# Altium PCB Relay-10A-Switching-Board-v2.0.PcbDoc (part 3 of 3)
Units mil, origin at the board's own origin, x right, y up, seen from the top; angles counter-clockwise.
Board outline 8267.72 x 4330.71 mil, 2 copper layers (Top Layer, Bottom Layer), stack 62.205 mil thick; 145 components, 106 nets, 426 pads, 105 vias.
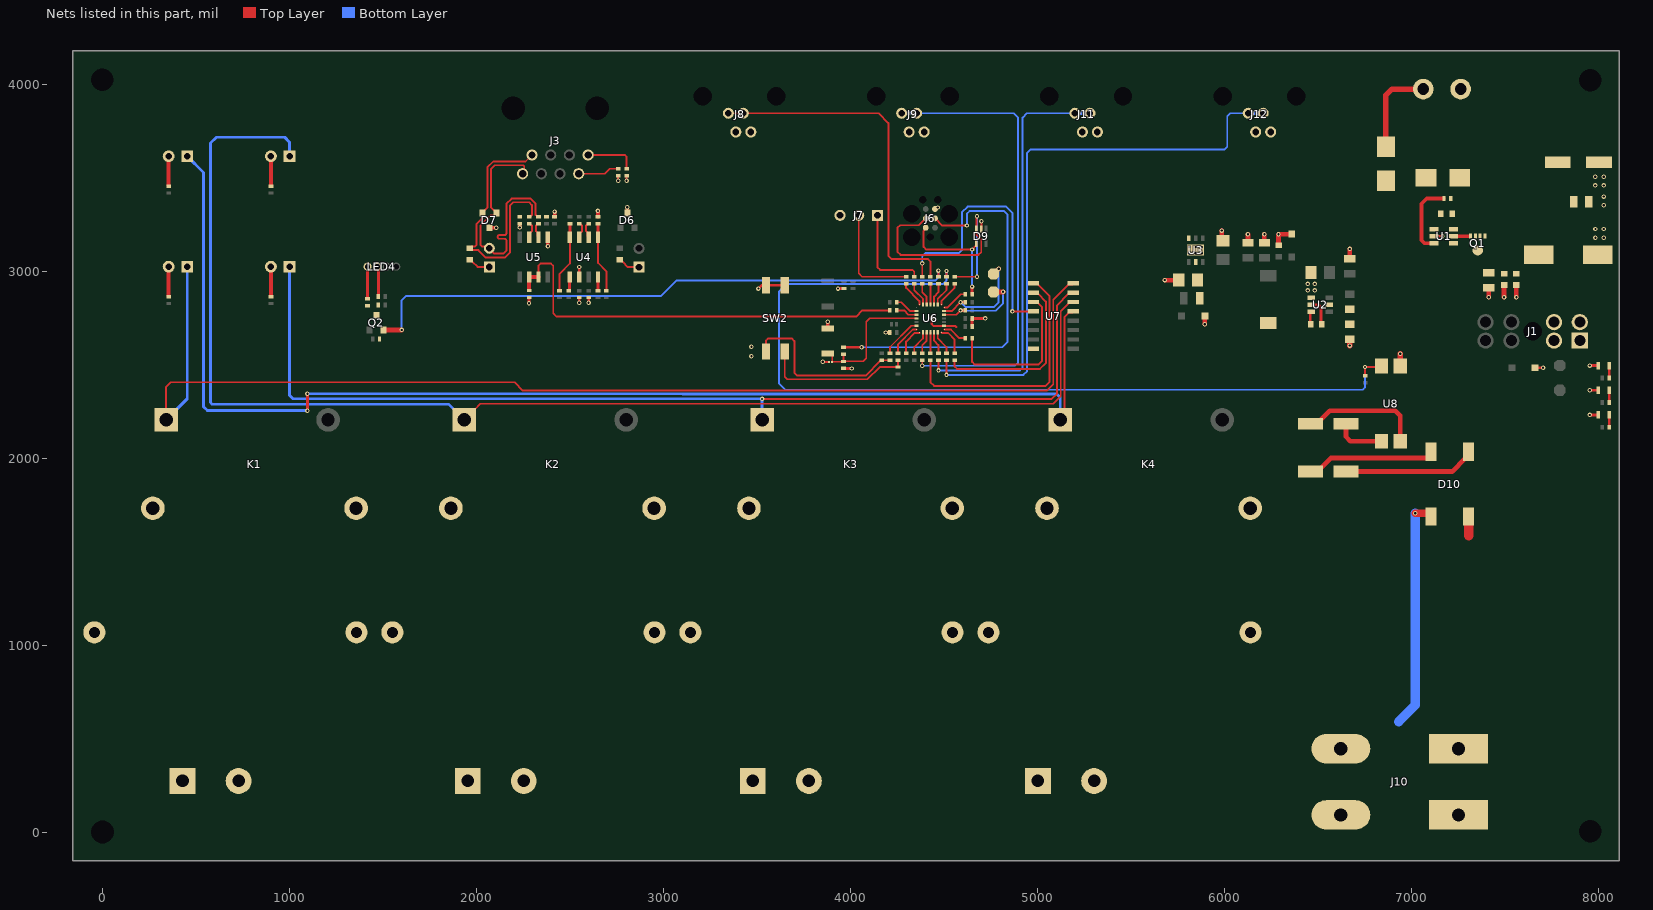
[diagram p2: the nets of this part, all layers, seen from the top]

## Via types
v1: diameter 23.62, hole 11.81, Top Layer to Bottom Layer, tented both sides, 105 vias

## Nets (pads, with @x,y where several pads share a name; then routed paths per layer and width w, separated by ;. In a path a pad name is that pad's centre, name@x,y a point inside that pad or via, vN(x,y) a via of type N, cw(c..) or ccw(c..) an arc to the next point about the centre after c; other vN are vias at no path point) (continued)
DI_PA15: R44.1 R52.1 U8.4 | length 4891.3
  Top Layer w10: R44.1@4513.5,2969.63 v1(4513.5,3000.28) ; R52.1@6750.33,2440.08 6750.81,2440.56 6750.81,2486.29 v1(6751.29,2486.77) 6834.89,2486.77 U8.4@6839.76,2491.64
  Bottom Layer w10: v1(4513.5,3000.28) 4513.5,2950.49 4493.12,2930.1 3658.4,2930.1 3617.53,2889.24 3617.53,2398.84 3650.95,2365.42 6738.7,2365.42 6751.29,2378.01 v1(6751.29,2486.77)
DO_PA5: R33.1 U7.1 | length 1345
  Top Layer w10: R33.1@4427.14,2523.13 4427.14,2405.79 4447.12,2385.81 5042.93,2385.81 5064.51,2407.39 5064.51,2866.29 5003.14,2927.66 5003.14,2927.82 4996.72,2934.24 U7.1@4978.61,2934.24
DO_PB0: R23.1 U7.2 | length 954.7
  Top Layer w10: R23.1@4556.67,2523.13 4556.67,2489.3 4569.97,2476 5012.68,2476 5044.51,2507.83 5044.51,2836.45 5003.14,2877.82 4996.72,2884.24 U7.2@4978.61,2884.24
DO_PB1: R25.1 U7.3 | length 857.7
  Top Layer w10: R25.1@4650.39,2640.03 4650.39,2514.44 4664.83,2500 5003.68,2500 5024.51,2520.82 5024.51,2807.13 5003.82,2827.82 4985.03,2827.82 U7.3@4978.61,2834.24
DO_PB5: R32.1 U7.4 | length 1472.7
  Top Layer w10: R32.1@4383.97,2969.63 v1(4383.97,3040.65) ; v1(4866.04,2784.24) U7.4@4978.61,2784.24
  Bottom Layer w10: v1(4383.97,3040.65) 4383.97,3077.98 4403.18,3097.2 4581.39,3097.2 4595.97,3111.78 4595.97,3314.17 4626.14,3344.33 4833.07,3344.33 4866.04,3311.36 v1(4866.04,2784.24)
DO_PF1: R21.1 R46.1 U5.2 U5.3 | length 2347.2
  Top Layer w10: R21.1@2281.53,2895.7 2281.86,2896.04 R21.1@2281.86,2901.07 ; U5.3@2331.5,2968 2331.5,3028.4 2343.31,3040.21 2397.74,3040.21 2410.77,3027.18 2410.77,2773.47 2427.91,2756.33 4030.02,2756.33 4063.25,2789.56 R46.1@4210.89,2789.56
  Top Layer w20: R21.1@2281.86,2901.07 2281.51,2901.42 2281.51,2967.99 U5.3@2331.5,2968
GND: C1.2 C2.2 C3.1 C4.1 C5.1 C6.1 C9.1 C10.1 C11.1 C12.1 C13.1 C14.1 C15.1 C16.1 C17.1 C18.1 C19.1 C20.1 C21.2 C22.2 C23.2 D2.1 D3.2 D4.1 D5.1 D6.3 D7.3 D8.1 D9.2 J2.1 J6.5 J7.3 J8.2 J8.4 J9.2 J9.4 J11.2 J11.4 J12.2 J12.4 LED1.2 LED2.2 LED3.2 LED4.3 R4.1 R11.1 R12.1 R17.1 R21.2 R48.1 R60.2 SW1.2 SW2.3 SW2.4 U1.2 U2.4 U3.6 U3.7 U4.2 U5.5 U6.16 U7.8 U8.3 | length 2619.1
  Top Layer w10: v1@3852.32,2514.45 D8.1@3880.42,2514.45 ; D9.2@4699.06,3224.95 4699.69,3225.57 4699.69,3265.44 v1(4700.23,3265.99)
  Top Layer w11: v1(2757.88,3483) R11.1@2757.88,3509.56 ; v1(2802.88,3483) R12.1@2802.88,3509.55 ; v1(4434.42,2746.88) 4434.42,2715.54 4442.95,2707.01 U6.16@4500.96,2707.01 4558.74,2707.01 4565.49,2700.26
  Top Layer w15: C18.1@1475.5,2863.91 LED4.3@1475.5,3023.36 ; v1(2280.93,2828) 2281.23,2828.3 2281.23,2858.4 R21.2@2281.53,2858.7 ; v1(2549.22,2830) 2549.51,2830.29 2549.51,2857.92 C17.1@2549.79,2858.21 ; U4.2@2549.8,2968 v1(2549.79,3021.42) ; v1(2599.47,2830) 2599.89,2830.41 2599.89,2857.8 C16.1@2600.3,2858.21 ; v1(3507.81,2905.77) 3524.59,2922.55 3547.31,2922.55 SW2.4@3548.3,2923.55 SW2.3@3648.3,2923.55 ; v1(3852.24,2514.37) v1@3852.32,2514.45 ; v1(3933.28,2905.77) 3933.63,2906.12 3965.39,2906.12 R48.1@3965.75,2906.47 ; C20.1@3962.61,2479.46 3963.05,2479.02 4005.98,2479.02 v1(4006.42,2478.57) ; v1(4188.33,2671.2) C23.2@4210.88,2671.2 ; C22.2@4650.39,2703.2 C21.2@4650.39,2746.38 ; C21.2@4650.52,2746.51 v1@4720.3,2746.51 ; R4.1@6669.87,2636.37 R4.1@6670.01,2636.37 ; U1.2@7120.48,3186.12 v1@7165.73,3186.12 ; D2.1@7660.43,2483.06 v1(7703.34,2483.06) ; v1(7952.76,2230.57) LED3.2@7998.64,2230.61 ; v1(7952.76,2362.34) LED2.2@7998.24,2362.34 ; v1(7952.76,2494.02) LED1.2@7998.62,2494.04
  Top Layer w20: D7.3@2068.5,3229.32 2070.14,3230.96 v1(2105.9,3230.96) ; v1(2231.5,3232.92) R60.2@2231.5,3250.01 ; v1@2381.5,3132.67 U5.5@2381.5,3180.6 ; C19.1@2418.3,3291.25 2418.3,3316.9 v1@2419.08,3316.9 ; R17.1@2649.8,3291.85 v1@2649.8,3320.97 ; D6.3@2806.73,3311.34 v1@2806.73,3340.46 ; SW1.2@3878.95,2691.95 v1(3878.95,2728.57)
  Top Layer w25: v1(5680.07,2951.46) C15.1@5755.66,2951.46 ; D5.1@5894.1,2759.08 5894.75,2758.42 v1(5894.75,2715) ; C14.1@5985,3162.21 v1(5985,3216.35) ; C12.1@6125.25,3152.21 v1(6125.25,3196.39) ; C11.1@6213.25,3152.21 v1(6213.25,3196.39) ; C13.1@6288.89,3137.21 v1(6288.89,3196.39) 6357.58,3196.39 D4.1@6359.91,3198.72 ; C10.1@6670.01,3066.3 v1(6670.01,3118.39) ; v1(7413.19,2860) C4.1@7413.19,2910.14 ; v1(7494.88,2860) C5.1@7494.88,2925.14 ; v1(7560.88,2860) C6.1@7560.88,2925.13
  Top Layer w30: v1(6670.01,2601.39) R4.1@6670.01,2636.37 ; D3.2@6863.15,3663.83 6863.15,3940.59 6895.54,3972.98 J2.1@7062.82,3972.98 ; U8.3@6939.76,2491.64 v1(6939.76,2557.16)
  other v1: 3470,2544.75 3470,2595 4720.42,2746.63 6445.6,2896.07 6482.6,2896.07 6445.6,2931.07 6482.6,2931.07 5812.93,3095.47 5845.93,3095.47 5878.93,3095.47 5812.93,3128.47 5845.93,3128.47 5878.93,3128.47 2381.77,3132.4 7983.15,3177.9 8028.15,3177.9 7165.89,3185.96 7983.15,3224.54 8028.15,3224.54 2417.98,3318 2649.53,3321.24 4466.91,3339.62 2806.46,3340.73 8028.15,3351.18 8028.15,3397.82 7982.75,3457.54 8027.75,3457.54 7982.75,3504.19 8027.75,3504.19
ID0: R22.1 R38.1 SW2.1 | length 938.2
  Top Layer w10: SW2.1@3548.3,2569.22 3548.3,2628.3 3560,2640 3685,2640 3700,2625 3700,2456.78 3715.83,2440.96 4081.61,2440.96 4159.78,2519.13 4160.19,2519.13 4163.78,2522.72 R38.1@4163.78,2523.13 ; R38.1@4167.69,2523.13 R22.1@4211.25,2523.13
ID1: R24.1 R37.1 SW2.2 | length 810.3
  Top Layer w10: SW2.2@3648.3,2569.22 3648.3,2434.56 3661.9,2420.96 4090.77,2420.96 4156.22,2486.41 R37.1@4254.43,2486.41 R24.1@4254.43,2523.13
LED: Q2.2 R27.1 R49.1 | length 3247
  Top Layer w10: Q2.2@1501.68,2685.23 Q2.2@1502.07,2684.84 ; R27.1@4470.33,2969.63 v1(4470.33,3002)
  Top Layer w25: Q2.2@1502.07,2684.84 v1(1600,2684.84)
  Bottom Layer w10: v1(1600,2684.84) 1600,2843.78 1621.73,2865.51 2985.94,2865.51 3070.53,2950.1 4454.78,2950.1 4470.33,2965.64 v1(4470.33,3002)
LED1_DIN: LED4.4 R51.2 | length 171.4
  Top Layer w10: LED4.4@1417.48,3023.36 LED4.4@1417.6,3023.23 ; R51.2@1417.6,2852.24 R51.2@1417.73,2852.11
  Top Layer w15: R51.2@1417.6,2852.24 LED4.4@1417.6,3023.23
LIVE: D10.4 J10.1 J15.1 J16.1 J21.1 J22.1 | length 102.6
  Top Layer w50: 7305.22,1584.78 D10.4@7305.22,1687.37
NetC2_1: C2.1 C3.2 C7.2 D1.2 J2.2 Q1.1 Q1.2 Q1.3 R1.1 U1.6
NetC7_1: C7.1 U1.1
NetC8_1: C8.1 L1.1 U2.5 | length 150.6
  Top Layer w15: U2.5@6462.6,2818.77 U2.5@6464.81,2818.77 6503.69,2818.77 6515.92,2806.55 C8.1@6515.92,2714.36
NetC8_2: C8.2 U2.6 | length 68.6
  Top Layer w15: C8.2@6458.74,2714.36 6458.74,2777.51 U2.6@6462.6,2781.37
NetC15_2: C15.2 F1.1 U3.2
NetD1_1: D1.1 D3.1
NetD10_1: D10.1 R53.1 | length 711.5
  Top Layer w25: R53.1@6649.55,1927.75 7218.11,1927.75 7288.19,1997.83 7288.19,2017.59 D10.1@7305.22,2034.62
NetD10_2: D10.2 R54.1 | length 696.1
  Top Layer w25: R54.1@6460,1927.75 6495.43,1927.75 6567.69,2000 7082.41,2000 7104.43,2022.03 D10.2@7104.43,2034.62
NetJ3_7: J3.7 R11.2 | length 221.9
  Top Layer w10: J3.7@2546.85,3520.31 2685.79,3520.31 2712.03,3546.55 R11.2@2757.88,3546.56
NetJ3_8: J3.8 R12.2 | length 274.4
  Top Layer w10: J3.8@2596.84,3620.31 2793.65,3620.31 2802.88,3611.08 R12.2@2802.88,3546.55
NetJ4_1: J4.1 R15.1 | length 119.1
  Top Layer w10: R15.1@2766.68,3061.28 2778.18,3049.78 2781.13,3049.78 2810.11,3020.81 J4.1@2869.05,3020.81
NetJ5_1: J5.1 R20.1 | length 120.9
  Top Layer w10: R20.1@1964.47,3061.28 1966.97,3061.28 1978.47,3049.78 1978.47,3048.99 2005.67,3021.79 J5.1@2068.5,3021.79
NetJ6_3: J6.3 R30.1 | length 2049.3
  Top Layer w10: J6.3@4452.14,3281.48 4490.34,3243.29 v1(4622.81,3243.29)
  Top Layer w15: R30.1@3962.45,2592.73 3962.53,2592.65 4059.19,2592.65 v1(4059.27,2592.57)
  Bottom Layer w10: v1(4059.27,2592.57) 4810.57,2592.57 4840.06,2622.06 4840.06,3301.1 4821.16,3320 4636.33,3320 4622.81,3306.48 v1(4622.81,3243.29)
NetJ15_2: J15.2 K1.3
NetJ16_2: J16.2 K2.3
NetJ21_2: J21.2 K3.3
NetJ22_2: J22.2 K4.3
NetLED1_1: LED1.1 R2.2 | length 65.8
  Top Layer w15: R2.2@8057.61,2428.33 8057.65,2428.38 8057.65,2494.02 LED1.1@8057.69,2494.06
NetLED2_1: LED2.1 R5.2 | length 65.8
  Top Layer w15: R5.2@8057.61,2296.61 R5.2@8057.61,2296.61 LED2.1@8057.69,2362.34 LED2.1@8057.69,2362.34
NetLED3_1: LED3.1 R6.2 | length 65.8
  Top Layer w15: R6.2@8057.62,2164.89 R6.2@8057.62,2164.89 LED3.1@8057.69,2230.61 LED3.1@8057.69,2230.61
NetLED5_2: LED5.2 R55.2 | length 160.4
  Top Layer w10: R55.2@353.76,2863.36 354.19,2863.79 R55.2@354.19,2867.5
  Top Layer w20: LED5.2@353.73,3023.33 353.73,2867.96 R55.2@354.19,2867.5
NetLED6_2: LED6.2 R56.2 | length 160.2
  Top Layer w10: R56.2@901,3453.91 901.19,3454.1 R56.2@901.19,3456.47
  Top Layer w20: LED6.2@900.94,3613.91 900.97,3456.69 R56.2@901.19,3456.47
NetLED7_2: LED7.2 R57.2 | length 160.4
  Top Layer w10: R57.2@901.01,2863.36 901.52,2863.87 R57.2@901.52,2865.19
  Top Layer w20: LED7.2@900.94,3023.36 900.97,2865.73 R57.2@901.52,2865.19
NetLED8_2: LED8.2 R58.2 | length 160.6
  Top Layer w10: R58.2@353.76,3453.91 354.51,3454.66 R58.2@354.51,3458.99
  Top Layer w20: LED8.2@353.73,3613.88 353.73,3459.77 R58.2@354.51,3458.99
NetQ1_4: Q1.4 U1.5 | length 88.9
  Top Layer w20: U1.5@7223.63,3186.12 Q1.4@7312.55,3186.12
NetQ2_3: Q2.3 R50.1 R51.1
NetR1_2: R1.2 U1.3 | length 399.5
  Top Layer w20: U1.3@7120.48,3148.72 7069.38,3148.72 7053.15,3164.95 7053.15,3359.34 7081.32,3387.51 R1.2@7172.54,3387.51
NetR3_1: R3.1 R4.2 U2.2
NetR7_1: R7.1 R8.2 U4.8 | length 375.8
  Top Layer w10: R8.2@2444.5,2895.35 2444.5,2984.91 2499.8,3040.21 U4.8@2499.8,3180.6
  Top Layer w15: U4.8@2499.8,3180.6 R7.1@2499.8,3248.2
NetR9_2: R9.2 U4.1 | length 76.3
  Top Layer w15: R9.2@2493.79,2895.21 2495.48,2895.21 2496.98,2896.71 2496.98,2965.18 U4.1@2499.8,2968
NetR10_1: R10.1 U4.7 | length 100.8
  Top Layer w10: U4.7@2549.8,3180.6 2549.8,3183.1 U4.7@2549.8,3185.6 ; U4.7@2549.79,3199.29 U4.7@2549.79,3185.61 ; R10.1@2549.79,3253.21 2553.76,3253.22 2564.43,3242.55 2564.43,3213.48 2549.8,3198.85 U4.7@2549.8,3185.6
NetR13_2: R13.2 U4.4 | length 72.8
  Top Layer w15: R13.2@2649.79,2895.21 U4.4@2649.8,2968
NetR14_1: R14.1 U4.6 | length 86.1
  Top Layer w10: U4.6@2599.8,3180.6 2592.99,3187.41 2592.99,3206.43 2585.95,3213.47 2585.95,3242.63 2592.3,3248.98 2592.3,3249.21 2596.3,3253.21 R14.1@2599.79,3253.22
NetR16_2: R16.2 R17.2 U4.5 | length 371.6
  Top Layer w10: U4.5@2649.8,3180.6 2649.8,3043.42 2694.8,2998.42 R16.2@2694.79,2895.21
  Top Layer w15: U4.5@2649.8,3180.6 R17.2@2649.8,3248.2
NetR18_1: R18.1 U5.7 | length 100.8
  Top Layer w10: U5.7@2281.5,3180.6 2281.5,3183.1 U5.7@2281.5,3185.6 ; U5.7@2281.5,3199.29 U5.7@2281.5,3185.6 ; R18.1@2281.49,3253.22 2285.46,3253.22 2296.13,3242.55 2296.13,3213.48 2281.5,3198.85 U5.7@2281.5,3185.6
NetR19_1: R19.1 U5.6 | length 86.1
  Top Layer w10: U5.6@2331.5,3180.6 2324.69,3187.41 2324.69,3206.42 2317.65,3213.46 2317.65,3242.63 2324,3248.98 2324,3249.21 2328,3253.21 R19.1@2331.5,3253.21
NetR53_2: R53.2 U8.1 | length 270.1
  Top Layer w25: R53.2@6649.55,2183.65 6649.55,2113.43 6672.92,2090.06 U8.1@6839.76,2090.06
NetR54_2: R54.2 U8.2 | length 657.9
  Top Layer w25: R54.2@6460,2183.65 6495.43,2183.65 6514.43,2202.65 6514.43,2204.59 6563.4,2253.56 6913.3,2253.56 6939.76,2227.1 U8.2@6939.76,2090.06
NEUTRAL: D10.3 J10.2 J13.2 J14.2 J19.2 J20.2 | length 1248.2
  Top Layer w40: v1(7020,1705) 7094.91,1705 7104.43,1695.47 D10.3@7104.43,1687.37
  Bottom Layer w50: 6930.85,590.16 7020,679.32 v1(7020,1705)
NRST_MCU: C20.2 D8.2 R30.2 SW1.1 U6.4 | length 760.7
  Top Layer w8: SW1.1@3878.95,2558.1 3889.43,2558.1 3901.57,2545.95 3901.57,2514.45 3960.6,2514.45 ccw(c3960.6,2516.46) C20.2@3962.61,2516.46 4067.38,2516.46 4085.2,2534.28 4085.2,2728.84 4102.74,2746.38 U6.4@4353.33,2746.38 ; R30.2@3962.61,2555.4 R30.2@3962.94,2555.74
  Top Layer w10: C20.2@3962.61,2516.46 R30.2@3962.61,2555.4
PA0: R22.2 U6.6 | length 222.5
  Top Layer w10: R22.2@4211.25,2560.13 4211.26,2593.65 4324.62,2707.01 U6.6@4353.33,2707.01
PA1: R24.2 U6.7 | length 178.5
  Top Layer w10: R24.2@4254.43,2560.13 4254.43,2607.73 4334.03,2687.33 U6.7@4352.34,2687.33
PA2: R26.2 U6.8 | length 154.3
  Top Layer w10: R26.2@4297.61,2558.16 4297.61,2560.13 4297.61,2622.63 4344.41,2669.42 4368.09,2669.42
PA3: R28.2 U6.9 | length 131.9
  Top Layer w10: R28.2@4340.79,2558.16 4340.79,2592.94 4387.77,2639.93 U6.9@4387.77,2670.6
PA4: R31.2 U6.10 | length 122.2
  Top Layer w10: R31.2@4383.97,2558.16 4383.97,2603.89 4407.46,2627.39 U6.10@4407.46,2670.6
PA5: R33.2 U6.11 | length 112.4
  Top Layer w10: R33.2@4427.14,2558.16 U6.11@4427.14,2670.6
PA6: R35.2 U6.12 | length 122.2
  Top Layer w10: U6.12@4446.83,2670.6 4446.83,2627.39 4470.32,2603.89 R35.2@4470.32,2558.16
PA7: R39.2 U6.13 | length 131.9
  Top Layer w10: U6.13@4466.51,2670.6 4466.51,2639.93 4513.5,2592.94 R39.2@4513.5,2558.16
PA11: R40.2 TP3.1 U6.19 | length 479.3
  Top Layer w10: U6.19@4500.96,2766.07 4565.49,2766.07 v1(4588.98,2789.56)
  Top Layer w15: v1(4588.98,2789.56) R40.2@4613.4,2789.56 ; TP3.1@4765.42,2887.46 TP3.1@4766.08,2888.12 ; v1@4815.58,2888.12 v1(4816.25,2888.78)
  Top Layer w25: TP3.1@4766.08,2888.12 v1@4815.58,2888.12
  Bottom Layer w10: v1(4588.98,2789.56) 4590.84,2787.71 4776.35,2787.71 4816.25,2827.61 v1(4816.25,2888.78)
PA12: R41.2 TP4.1 U6.20 | length 567.1
  Top Layer w10: U6.20@4500.96,2785.75 4540.53,2785.75 4586.99,2832.21 4592.45,2832.21 v1@4592.98,2832.74
  Top Layer w15: v1@4592.98,2832.74 R41.2@4613.39,2832.73 ; TP4.1@4765.42,2984.57 TP4.1@4765.42,2984.83 ; TP4.1@4767.5,2997.26 TP4.1@4777.84,2997.26 ; v1@4792.44,3011.85 v1(4792.44,3012.11)
  Top Layer w25: TP4.1@4777.84,2997.26 v1@4792.44,3011.85
  Bottom Layer w10: v1(4588.98,2832.74) 4614.01,2807.71 4767.71,2807.71 4792.44,2832.44 v1(4792.44,3012.11)
PA13: R42.1 U6.21 | length 140.6
  Top Layer w10: U6.21@4501.95,2805.44 4520.26,2805.44 4590.74,2875.91 R42.1@4613.4,2875.91
PA14: R43.1 U6.22 | length 140.6
  Top Layer w10: U6.22@4486.2,2821.19 4486.2,2839.5 4556.68,2909.97 R43.1@4556.68,2932.64
PA15: R44.2 U6.23 | length 131.9
  Top Layer w10: U6.23@4466.51,2820.2 4466.51,2850.87 4513.5,2897.85 R44.2@4513.5,2932.63
PB0: R23.2 U6.14 | length 161.6
  Top Layer w10: U6.14@4486.2,2671.58 4489.18,2668.6 4521.65,2668.6 4556.68,2633.57 R23.2@4556.67,2560.13 R23.2@4556.68,2558.16
PB1: R25.2 U6.15 | length 130.4
  Top Layer w10: U6.15@4501.95,2687.33 4536.91,2687.33 4582.7,2641.54 R25.2@4613.39,2641.54
PB3: R27.2 U6.24 | length 122.2
  Top Layer w10: U6.24@4446.83,2820.2 4446.83,2863.41 4470.32,2886.9 R27.2@4470.33,2932.63
PB4: R29.2 U6.25 | length 112.4
  Top Layer w10: U6.25@4427.14,2820.2 R29.2@4427.15,2932.63
PB5: R32.2 U6.26 | length 122.2
  Top Layer w10: R32.2@4383.97,2932.63 4383.97,2886.9 4407.46,2863.41 U6.26@4407.46,2820.2
PB6: R34.2 U6.27 | length 131.9
  Top Layer w10: R34.2@4340.79,2932.63 4340.79,2897.85 4387.77,2850.87 U6.27@4387.77,2820.2
PB7: R36.2 U6.28 | length 140.6
  Top Layer w10: R36.2@4297.61,2932.63 4297.61,2909.97 4368.09,2839.5 U6.28@4368.09,2821.19
PF0: R45.2 U6.2 | length 124.9
  Top Layer w10: R45.2@4247.89,2832.74 4271.95,2832.74 4318.94,2785.75 U6.2@4353.33,2785.75
PF1: R46.2 U6.3 | length 115.2
  Top Layer w10: R46.2@4247.89,2789.56 4286.62,2789.56 4310.12,2766.07 U6.3@4353.33,2766.07
RELAY-1: K1.1 LED5.1 U7.16 | length 6423.3
  Top Layer w10: K1.1@340.51,2204.07 340.51,2380.47 365.03,2405 2204,2405 2248.04,2360.96 5049.73,2360.96 5084.51,2395.73 5084.51,2846.75 5165.58,2927.82 5184.79,2927.82 U7.16@5191.21,2934.24
  Bottom Layer w15: K1.1@340.51,2204.07 453.7,2317.27 LED5.1@453.7,3023.36
RELAY-2: K3.1 LED7.1 U7.15 | length 5510.2
  Top Layer w10: v1(3527.48,2316.11) 5076.15,2316.11 5104.51,2344.47 5104.51,2816.78 5165.55,2877.82 5184.79,2877.82 U7.15@5191.21,2884.24
  Bottom Layer w15: LED7.1@1000.94,3023.36 1000.94,2335.74 1019.64,2317.04 3526.55,2317.04 v1(3527.48,2316.11) 3527.48,2204.52 K3.1@3527.93,2204.07
RELAY-3: K2.1 LED6.1 U7.14 | length 7088.5
  Top Layer w10: K2.1@1934.22,2204.07 1992.21,2262.07 2020.19,2290.05 5084.45,2290.05 5124.51,2330.1 5124.51,2785.63 5166.68,2827.8 5173.1,2834.24 U7.14@5191.21,2834.24
  Bottom Layer w15: LED6.1@1000.94,3613.91 1000.94,3688.57 974.51,3715 608.9,3715 577.74,3683.84 577.74,2296.81 586.52,2288.03 1850.27,2288.03 K2.1@1934.22,2204.07
RELAY-4: K4.1 LED8.1 U7.13 | length 6803.5
  Top Layer w10: K4.1@5121.64,2204.07 5144.51,2226.93 5144.51,2755.72 5166.61,2777.82 5184.79,2777.82 U7.13@5191.21,2784.24
  Top Layer w15: v1(1095.75,2253.33) v1(1095.75,2343.35)
  Bottom Layer w15: LED8.1@453.7,3613.91 540,3527.61 540,2274.21 560.88,2253.33 v1(1095.75,2253.33) ; v1(1095.75,2343.35) 3101.16,2343.35 3101.59,2342.92 5103.02,2342.92 5121.64,2324.3 K4.1@5121.64,2204.07
RLY-PWR-1: J13.1 K1.4
RLY-PWR-2: J19.1 K3.4
RLY-PWR-3: J14.1 K2.4
RLY-PWR-4: J20.1 K4.4
RS485_N: D7.2 J3.2 R18.2 R20.2 R60.1 | length 1447.4
  Top Layer w10: R18.2@2281.49,3290.22 2285.49,3294.22 2290.64,3294.22 2296.5,3300.08 2296.5,3352.36 2281.29,3367.57 2195.86,3367.57 2180,3351.72 2180,3100.63 2151.48,3072.11 2050.32,3072.11 2010.34,3112.09 1973.66,3112.09 R20.2@1964.47,3121.28 1974.17,3130.99 1991.17,3130.99 2000.81,3140.63 2000.81,3251.68 2031.58,3282.45 2031.58,3309.22 D7.2@2031.1,3309.7 2031.1,3311.67 2042.24,3322.81 2042.39,3322.81 2058.5,3338.92 2058.5,3553.96 2090.25,3585.71 2262.24,3585.71 J3.2@2296.84,3620.31
RS485_P: D7.1 J3.1 J5.2 R19.2 R59.1 | length 1447.3
  Top Layer w10: J3.1@2246.84,3520.31 2255.37,3528.84 2255.37,3559.86 2249.51,3565.71 2098.54,3565.71 2078.5,3545.68 2078.5,3338.68 2094.38,3322.81 2094.76,3322.81 2105.9,3311.67 D7.1@2105.9,3309.7 2094.76,3298.56 2075.97,3298.56 2020.81,3243.39 2020.81,3140.1 2030.37,3130.53 2059.76,3130.53 J5.2@2068.5,3121.79 2068.5,3119.02 2094.46,3093.06 2144.14,3093.06 2160,3108.92 2160,3142.63 2160,3162.22 ccw(c2150,3162.22) 2150,3172.22 2123.15,3172.22 cw(c2123.15,3182.22) 2123.15,3192.22 2150,3192.22 ccw(c2150,3202.22) 2160,3202.22 2160,3227.22 2160,3360 2187.57,3387.57 2289.57,3387.57 2316.5,3360.65 2316.5,3300.07 2322.35,3294.21 2327.5,3294.21 R19.2@2331.5,3290.21
SWCLK: D9.3 J6.4 R43.2 | length 1403.7
  Top Layer w10: J6.4@4402.14,3281.48 4365.39,3244.73 4265.22,3244.73 4250.85,3230.36 4250.85,3103.61 4267.88,3086.59 4684.31,3086.59 4699.14,3101.42 4699.14,3168.98 4673.55,3194.57 D9.3@4673.55,3224.1 ; R43.2@4556.68,2969.64 v1@4673.42,2969.64 ; D9.3@4673.7,3224.24 4673.7,3286.48 4676.42,3289.2 v1(4676.42,3292.89)
  Bottom Layer w10: v1(4676.42,2969.64) v1(4676.42,3292.89)
SWDIO: D9.4 J6.2 R42.2 | length 655.9
  Top Layer w10: J6.2@4402.14,3231.48 4402.14,3226.09 4391.19,3215.13 4391.19,3129.13 4405.43,3114.89 v1(4650.42,3114.89) 4670.15,3134.61 4671.66,3134.61 4673.55,3136.5 D9.4@4673.55,3149.3
  Top Layer w15: R42.2@4650.4,2875.91 v1@4650.41,2916.56
  Bottom Layer w10: v1(4650.42,2916.57) v1(4650.42,3114.89)
TIM3_CH1: J8.1 J8.3 R29.1 | length 1906.2
  Top Layer w10: J8.1@3346.81,3843.65 J8.3@3427.12,3843.65 4150,3843.65 4202.39,3791.26 4202.39,3080.73 4218.66,3064.46 4413.54,3064.46 4427.15,3050.85 4427.15,3002 R29.1@4427.15,2969.63
TIM14_CH1: J9.1 J9.3 R31.1 | length 2497.6
  Top Layer w10: v1@4383.96,2488.33 R31.1@4383.96,2523.13
  Bottom Layer w10: J9.3@4353.73,3843.65 4873.6,3843.65 4896.56,3820.68 4896.56,3798.68 4896.56,2510.14 4879.75,2493.33 v1(4383.96,2493.33)
  Bottom Layer w20: J9.1@4273.42,3843.65 J9.3@4353.73,3843.65
TIM16_CH1: J11.1 J11.3 R35.1 | length 2217.9
  Top Layer w10: R35.1@4470.32,2523.13 4470.42,2523.03 4470.42,2468.56 v1(4470.53,2468.46)
  Bottom Layer w10: v1(4470.53,2468.46) 4906.06,2468.46 4920.05,2482.45 4920.05,3820.28 4943.41,3843.65 J11.1@5200.03,3843.65
  Bottom Layer w20: J11.1@5200.03,3843.65 J11.3@5280.34,3843.65
TIM17_CH1: J12.1 J12.3 R39.1 | length 3131.9
  Top Layer w10: v1(4513.24,2444.65) 4513.37,2444.78 4513.37,2523 R39.1@4513.5,2523.13
  Bottom Layer w10: v1(4513.24,2444.65) 4925.01,2444.65 4944.7,2464.34 4944.7,3632.34 4961.36,3649 5998.83,3649 6014.65,3664.82 6014.65,3828.6 6029.69,3843.65 J12.1@6126.65,3843.65
  Bottom Layer w20: J12.1@6126.65,3843.65 J12.3@6206.95,3843.65
USART1_RX: J7.2 R36.1 | length 571.3
  Top Layer w10: J7.2@4044.18,3297.7 4044.18,2987 4061.54,2969.63 R36.1@4297.61,2969.63
USART1_TX: J7.1 R34.1 | length 511
  Top Layer w10: J7.1@4144.18,3297.7 4144.18,3019.76 4158.35,3005.59 4331.64,3005.59 4340.79,2996.43 R34.1@4340.79,2969.63
VIN: C1.1 C4.2 C5.2 C6.2 J1.1 J1.2 J1.7 J1.8 Q1.5 U1.4
pads on no net: D9.1 D9.5 J1. J3. J3.3 J3.6 J6.6 J6.MP1 J6.MP2 J6.MP3 J6.MP4 J6.MP5 J6.MP6 J6.MP7 J8. J9. J11. J12. LED4.1 U3.1 U3.4 U3.5 U7.5 U7.6 U7.7 U7.10 U7.11 U7.12

## Polygon pours and split planes (outlines as drawn)
NEUTRAL on Top Layer "NEUTRAL_L01_P021" (solid, remove dead copper, pour order 21): 588.68,565 6900,565 6900,-114.46 588.68,-114.46
3V3 on Top Layer "3V3_L01_P016" (solid, remove dead copper, pour order 16): 7533.69,2242.31 7931,2242.31 7931,2189.84 8029.62,2189.84 8029.62,2135.18 7493.82,2135.18 7331.74,2297.26 5634,2297.26 5634,2886.66 5812.76,2886.66 5812.76,2412.08 7363.92,2412.08
LIVE on Top Layer "LIVE_L01_P020" (solid, pour order 20): 7715.36,1612.61 cw(c7715.36,1572.14) 7755.83,1572.14 7755.83,-114.46 6978.74,-114.46 6978.74,643.74 -127.59,643.74 -127.59,826.77 -129.47,826.77 -129.47,1609.52 7028,1609.52 7028,1571 7205,1571 7205,1612.61
NetC2_1 on Top Layer "NETC2_1_L01_P023" (solid, pour order 23): 7331.43,3167.09 7331.43,3211.32 7199.31,3211.32 7199.31,3545.84 7199.31,4149.13 8074.23,4149.13 8074.23,3640 7894.8,3640 7894.8,3167.09
VIN on Top Layer "VIN_L01_P025" (solid, remove dead copper, pour order 25): 7286.37,3163.1 7286.37,3146.7 7894.8,3146.7 7894.8,3012.22 8075.15,3012.22 8075.15,2557.16 7647.8,2557.16 7647.8,2970.14 7199.31,2970.14 7199.31,3163.1
24V on Top Layer "24V_L01_P027" (solid, remove dead copper, pour order 27): 7931,2536 7931,2453.38 8029.62,2453.38 8029.62,2413.56 7569.5,2413.56 7425.9,2557.16 7134.84,2557.16 6847.64,2844.36 6527.04,2844.36 6527.04,3026.29 6973.71,3026.29 7204.72,2795.28 7627.25,2795.28 7627.25,2536
GND on Top Layer "GND_L01_P028" (solid, remove dead copper, pour order 28): 5634,2907.05 5956,2907.05 7110,2907.05 7110,2110 8109.87,2110 8109.87,4176.88 -157.85,4176.88 -157.85,2425 5214.63,2425 5214.63,2967.04 5634,2967.04
5V on Top Layer "5V_L01_P017" (solid, remove dead copper, pour order 17): 6794.33,2486.77 6794.33,2541.01 6985.31,2541.01 6985.31,2435.81 7373.19,2435.81 7541.68,2267.32 8029.62,2267.32 8029.62,2321.34 7931,2321.34 7931,2393.1 7552.56,2393.1 7408.89,2536.77 7119.23,2536.77 6832,2824 6721.33,2824 6721.33,2667.09 6069.43,2667.09 6069.43,2916.46 6405.77,2916.46 6405.77,3098.82 5956.21,3098.82 5956.21,2435.81 6729.5,2435.81 6729.5,2486.77
RLY-PWR-4 on Bottom Layer "RLY-PWR-4_L02_P024" (solid, pour order 24): 4987.43,918 4661,918 4661,200.54 5158,200.54 5158,472.44 5507.43,472.44 5507.43,1811.02 4987.43,1811.02
RLY-PWR-2 on Bottom Layer "RLY-PWR-2_L02_P011" (solid, pour order 11): 3393.71,918 3113.71,918 3113.71,200.54 3640,200.54 3640,472.44 3913.71,472.44 3913.71,1811.02 3393.71,1811.02
RLY-PWR-1 on Bottom Layer "RLY-PWR-1_L02_P022" (solid, pour order 22): 206.29,918 -41,918 -41,200.5 551,200.5 551,472.44 726.29,472.44 726.29,1811.02 206.29,1811.02
GND on Bottom Layer "GND_L02_P038" (solid, remove dead copper, pour order 38): -157.85,3610.91 585,3610.91 585,2040 8109.87,2040 8109.87,4176.88 -157.85,4176.88
3V3 on Bottom Layer "3V3_L02_P026" (solid, remove dead copper, pour order 26): 1624.72,3159.72 1655,3190 2256.96,3190 2277.33,3169.62 2277.33,2991.66 2307.55,2961.44 2927.62,2961.44 3086.18,3120 4128.71,3120 4253.44,3244.73 4635.13,3244.73 4635.13,3015.15 4896.56,2753.71 4896.56,2429.36 5599.95,2429.36 5620,2449.4 5620,2800 5760,2800 5760,2380.76 3669.39,2380.76 3634.71,2415.44 3634.71,2879.32 3684.98,2929.58 4466.13,2929.58 4466.13,2965.39 3057.54,2965.39 2976.75,2884.6 1462.59,2884.6 1440,2862.01 1440,2655 1422.8,2637.8 1313.64,2637.8 1299.21,2652.22 1299.21,2952.76 1315.82,2969.36 1606.13,2969.36 1624.72,2987.95
24V on Bottom Layer "24V_L02_P035" (solid, remove dead copper, pour order 35): 246.97,2111.63 247.51,2111.08 433.5,2111.08 433.5,2267.06 7330,2267.06 7330,2797.16 7585,2797.16 7585,2040 -120,2040 -120,3580 246.97,3580
NEUTRAL on Bottom Layer "NEUTRAL_L02_P033" (solid, pour order 33): 615,413.05 615,-114.46 6968.5,-114.46 6968.5,629.92 5567,629.92 5567,413.05 5217,413.05 5217,141.2 4602,141.2 4602,413.05 3700.79,413.05 3700.79,141.2 3054.18,141.2 3054.18,413.05 2131.61,413.05 2131.61,141.2 1456.69,141.2 1456.69,413.05
RLY-PWR-3 on Bottom Layer "RLY-PWR-3_L02_P001" (solid, pour order 1): 1800,918 1520,918 1520,200.5 2072.09,200.5 2072.09,472.44 2320,472.44 2320,1811.02 1800,1811.02
no net on Bottom Overlay "NONET_L02_P040" (hatched 45Degree grid 35 track 6, pour order 40): -122,1923 -122,2021.63 8075,2021.63 8075,1923

## Other copper
Top Layer:
  region net RS485_N: 2281.49,3295.37 2229.88,3295.37 2229.88,3285.34 2281.49,3285.34
  rectangle net RS485_P: 2331.63,3285.33 2376.39,3295.37
  rectangle net LED: 1472.62,2623.66 1517.82,2703.34
  rectangle net 3V3: 1410.74,2623.66 1453.62,2703.34
  rectangle net NetR3_1: 6638.94,2686.37 6700.94,2830.58
  rectangle net NetR3_1: 6539.61,2806.96 6684.87,2830.58
  rectangle net 24V: 6527.04,2844.36 6811.02,3026.29
  rectangle net NetC8_1: 6089.82,2687.48 6411.19,2830.58
  rectangle net NetC8_1: 6089.82,2806.96 6474.5,2830.58
  rectangle net GND: 6426.36,2844.36 6499.65,3027.79
  region net NetC15_2: 5863.83,2829.73 5863.83,3067.25 5825.26,3067.25 5825.26,2829.73
  region net 3V3: 5812.76,2723.32 5812.76,2886.66 5651.07,2886.66 5651.07,2723.32
  region net 5V: 6020,3028.88 6020,3064.99 5871.11,3064.99 5871.11,3028.88
  region net GND: 5817.88,3081.72 5817.88,3190.98 5798.2,3190.98 5798.2,3081.72
  region net NetC15_2: 5931.94,2804.74 5931.94,3016.37 5825.26,3016.37 5825.26,2804.74
  region net GND: 5932.77,3074.99 5932.77,3149.49 5788.19,3149.49 5788.19,3074.99
  rectangle net NetD1_1: 6790.15,3423.28 7137.87,3571.59
  rectangle net NetC7_1: 7096.47,3211.32 7172.04,3322.61
  rectangle net GND: 7916.8,3037.18 8075.15,3615.88
  rectangle net NetC2_1: 7331.43,3167.09 7416.03,3223.52
  rectangle net NetQ2_3: 1405.23,2742.05 1484.63,2830.56
  rectangle net 5V: 1503.63,2805.56 1521.63,2875.86
  pour cut-out: 1239.72,1067.89 ccw(c1358.19,1067.89) 1358.19,949.42 ccw(c1358.19,1067.89) 1476.67,1067.89 ccw(c1358.19,1067.89) 1358.19,1186.37 ccw(c1358.19,1067.89)
  pour cut-out: 2833.43,1067.89 ccw(c2951.9,1067.89) 2951.9,949.42 ccw(c2951.9,1067.89) 3070.38,1067.89 ccw(c2951.9,1067.89) 2951.9,1186.37 ccw(c2951.9,1067.89)
  pour cut-out: 4427.14,1067.89 ccw(c4545.62,1067.89) 4545.62,949.42 ccw(c4545.62,1067.89) 4664.09,1067.89 ccw(c4545.62,1067.89) 4545.62,1186.37 ccw(c4545.62,1067.89)
  pour cut-out: 6020.85,1067.89 ccw(c6139.33,1067.89) 6139.33,949.42 ccw(c6139.33,1067.89) 6257.8,1067.89 ccw(c6139.33,1067.89) 6139.33,1186.37 ccw(c6139.33,1067.89)
  pour cut-out: 1824.92,145.11 1824.92,401.02 2080.83,401.02 2080.83,145.11
  pour cut-out: 3349.74,145.11 3349.74,401.02 3605.64,401.02 3605.64,145.11
  pour cut-out: 4874.55,145.11 4874.55,401.02 5130.46,401.02 5130.46,145.11
  pour cut-out: 4939.08,2604.84 5009.21,2604.84 5009.21,2561.24 5230.73,2561.24 5230.74,2967.04 4939.08,2967.04
  pour cut-out: 2930,3695.32 2930,2745.52 1930.6,2745.51 1930.62,3695.32
  pour cut-out: 6069.42,2667.09 6069.43,2844.36 6721.33,2844.36 6721.33,2667.09
  pour cut-out: 3945.51,2672.59 3945.51,2610.5 3986.62,2610.5 3986.62,2529.53 3986.62,2497.46 3884.68,2497.46 3884.68,2529.53 3832.95,2529.53 3832.95,2672.59
Bottom Layer:
  rectangle net NetJ15_2: 890.25,984.25 1422.52,1811.02
  rectangle net NetJ22_2: 5671.39,984.25 6203.66,1811.02
  rectangle net NetJ21_2: 4077.68,984.25 4609.95,1811.02
  rectangle net NetJ16_2: 2483.96,984.25 3016.23,1811.02
  pour cut-out: 4527.14,3081.88 4955,3081.88 4955,3358.46 4527.15,3358.46
Multi-Layer:
  pour cut-out: 157.73,4022.68 cw(c-1.1,4022.68) -1.1,3863.84 cw(c-1.1,4022.68) -159.94,4022.68 cw(c-1.1,4022.68) -1.1,4181.51 cw(c-1.1,4022.68)
  pour cut-out: -158.84,0 cw(c0,0) 0,158.84 cw(c0,0) 158.84,0 cw(c0,0) 0,-158.84 cw(c0,0)
  pour cut-out: 7955.67,3861.3 cw(c7955.67,4020.13) 7796.83,4020.13 cw(c7955.67,4020.13) 7955.67,4178.97 cw(c7955.67,4020.13) 8114.5,4020.13 cw(c7955.67,4020.13)
  pour cut-out: 7956.04,-154.82 cw(c7956.04,4.02) 7797.2,4.02 cw(c7956.04,4.02) 7956.04,162.85 cw(c7956.04,4.02) 8114.87,4.02 cw(c7956.04,4.02)

## Silkscreen, mask and mechanical layers (free items; w line width, h text height)
Top Overlay:
  drawing of 21 lines, arcs and shapes, not listed
  text "Canagey 1.0" at 275.66,3953.19 h200
  text "4" at 2038.56,3823.63 h60
  text "GND" at 7134.81,3760.31 h78.74 r180
  text "+24V" at 7369.31,3760.29 h78.74 r180
  text "RELAY 4" at 262.5,3750.03 h78.74
  text "RELAY 3" at 809.74,3749.68 h78.74
  text "POWER IN" at 7369.24,3685.09 h100 r180
  text "3" at 2038.62,3660.98 h60
  text "DIMMER-1" at 3619.82,3636.18 h100 r180
  text "DIMMER-2" at 4546.43,3636.18 h100 r180
  text "DIMMER-3" at 5473.08,3636.18 h100 r180
  text "DIMMER-4" at 6400.4,3636.18 h100 r180
  text "SLAVE CAN IN" at 2721.84,3451.94 h100 r180
  text "UART" at 3895.18,3423.61 h78.74
  text "TAG" at 4276.06,3423.58 h78.74
  text "GND" at 3902.19,3367.97 h60
  text "RX" at 4033.71,3367.97 h60
  text "TX" at 4125.32,3367.97 h60
  text "4" at 2697.51,3272.93 h60
  text "3" at 2152.38,3236.8 h60
  text "RELAY 1" at 262.5,3159.48 h78.74
  text "RELAY 2" at 809.74,3159.48 h78.74
  text "CAN IN" at 1339.14,3159.14 h78.74
  text "ID0" at 3574.04,2978.8 h60 r90
  text "ID1" at 3674.01,2978.8 h60 r90
  text "BOOT" at 3800.39,2790.5 h78.74 r90
  text "CAN" at 2895.54,2785.44 h78.74 r90
  text "RS485" at 2093.2,2746.69 h78.74 r90
  text "FUSE" at 7237.49,2557.16 h100 r90
  text "RESET" at 3799.89,2523.81 h78.74 r90
  text "24V" at 7841.91,2468.35 h60
  text "5V0" at 7842.91,2336.6 h60
  text "3V3" at 7842.96,2204.88 h60
  text "FUSE - 10A" at -96.26,1335.53 h100
  text "FUSE - 10A" at 1497.45,1335.53 h100
  text "FUSE - 10A" at 3091.17,1335.53 h100
  text "FUSE - 10A" at 4684.88,1335.53 h100
  text "CAUTION" at 6680.35,1150.21 h120
  text "HIGH VOLTAGE" at 6577.24,1058.41 h120
  text "220VAC - INPUT" at 6420.68,834.21 h140
  text "NEUTRAL" at 6416.57,713.85 h100
  text "LIVE" at 7054.6,713.43 h100
  text "RELAY - 1" at 300.29,579.89 h100
  text "RELAY - 2" at 1825.1,579.89 h100
  text "RELAY - 3" at 3349.92,579.47 h100
  text "RELAY - 4" at 4874.73,579.89 h100
  text "NTRL" at 598.71,473 h100
  text "NTRL" at 2123.52,473 h100
  text "NTRL" at 3648.34,473 h100
  text "NTRL" at 5173.15,473 h100
  text "NO-1" at 298.21,471.76 h100
  text "N0-2" at 1823.02,471.76 h100
  text "NO-3" at 3347.84,471.76 h100
  text "NO-4" at 4872.65,471.76 h100
Bottom Overlay:
  drawing of 2 lines, arcs and shapes, not listed
  text "Rev-v2.0" at -82.59,2584.06 h60 r270
  text "RELAY-10A SWITCHING BOARD" at 23.88,2082.65 h60 r270
  text "CAUTION" at 7946.75,1521.72 h120
  text "HIGH VOLTAGE" at 8049.85,1429.93 h120
Bottom Solder:
  rectangle: 5420.82,-48 5952.82,280
  rectangle: 846.37,-48 1320,280
  rectangle: 2371.18,-48 2903.18,280
  rectangle: 3896,-48 4428,280
  rectangle: 5690,-80 6840,530
  rectangle: 846.37,-80 6840,82.39
Board Outline:
  lines w5: 197.03,1870 cw(c216.71,1870) 216.71,1889.69 716.71,1889.69 cw(c716.71,1870) 736.4,1870 cw(c716.71,1870) 716.71,1850.31 216.71,1850.31 cw(c216.71,1870) 197.03,1870 ; 889.49,1870 cw(c909.18,1870) 909.18,1889.69 1409.18,1889.69 cw(c1409.18,1870) 1428.86,1870 cw(c1409.18,1870) 1409.18,1850.31 909.18,1850.31 cw(c909.18,1870) 889.49,1870 ; 1790.74,1870 ccw(c1810.42,1870) 1810.42,1850.31 2310.42,1850.31 ccw(c2310.42,1870) 2330.11,1870 ccw(c2310.42,1870) 2310.42,1889.69 1810.42,1889.69 ccw(c1810.42,1870) 1790.74,1870 ; 2483.2,1870 ccw(c2502.89,1870) 2502.89,1850.31 3002.89,1850.31 ccw(c3002.89,1870) 3022.57,1870 ccw(c3002.89,1870) 3002.89,1889.69 2502.89,1889.69 ccw(c2502.89,1870) 2483.2,1870 ; 3384.45,1871.8 ccw(c3404.13,1871.8) 3404.13,1852.12 3904.13,1852.12 ccw(c3904.13,1871.8) 3923.82,1871.8 ccw(c3904.13,1871.8) 3904.13,1891.49 3404.13,1891.49 ccw(c3404.13,1871.8) 3384.45,1871.8 ; 4076.91,1871.8 ccw(c4096.6,1871.8) 4096.6,1852.12 4596.6,1852.12 ccw(c4596.6,1871.8) 4616.28,1871.8 ccw(c4596.6,1871.8) 4596.6,1891.49 4096.6,1891.49 ccw(c4096.6,1871.8) 4076.91,1871.8 ; 4978.16,1871.8 ccw(c4997.85,1871.8) 4997.85,1852.12 5497.85,1852.12 ccw(c5497.85,1871.8) 5517.53,1871.8 ccw(c5497.85,1871.8) 5497.85,1891.49 4997.85,1891.49 ccw(c4997.85,1871.8) 4978.16,1871.8 ; 5670.62,1871.8 ccw(c5690.31,1871.8) 5690.31,1852.12 6190.31,1852.12 ccw(c6190.31,1871.8) 6209.99,1871.8 ccw(c6190.31,1871.8) 6190.31,1891.49 5690.31,1891.49 ccw(c5690.31,1871.8) 5670.62,1871.8 ; 6989.23,1870.05 ccw(c7008.91,1870.05) 7008.91,1850.37 7398.91,1850.37 ccw(c7398.91,1870.05) 7418.6,1870.05 ccw(c7398.91,1870.05) 7398.91,1889.74 7008.91,1889.74 ccw(c7008.91,1870.05) 6989.23,1870.05
  lines w10: -157.85,-153.83 8109.87,-153.83 8109.87,4176.88 -157.85,4176.88 -157.85,-153.83
Fabrication:
  drawing of 191 lines, arcs and shapes, not listed
  text "Layer" at 9097.58,4071 h60
  text "Name" at 9507.49,4071 h60
  text "Material" at 10437.23,4071 h60
  text "Thickness" at 11297,4071 h60
  text "Constant" at 11946.84,4071 h60
  text "Board Layer Stack" at 12516.7,4071 h60
  text "Top Overlay" at 9507.49,3951 h60
  text "Top Solder" at 9507.49,3831 h60
  text "Solder Resist" at 10437.23,3831 h60
  text "0.010mm" at 11297,3831 h60
  text "3.5" at 11946.84,3831 h60
  text "1" at 9097.58,3711 h60
  text "Top Layer" at 9507.49,3711 h60
  text "0.070mm" at 11297,3711 h60
  text "Dielectric 1" at 9507.49,3591 h60
  text "FR-4" at 10437.23,3591 h60
  text "1.440mm" at 11297,3591 h60
  text "4.6" at 11946.84,3591 h60
  text "2" at 9097.58,3471 h60
  text "Bottom Layer" at 9507.49,3471 h60
  text "0.070mm" at 11297,3471 h60
  text "Bottom Solder" at 9507.49,3351 h60
  text "Solder Resist" at 10437.23,3351 h60
  text "0.010mm" at 11297,3351 h60
  text "3.5" at 11946.84,3351 h60
  text "Bottom Overlay" at 9507.49,3231 h60
  text "Total board thickness:" at 9097.58,3111 h60
  text "1.600mm" at 11297,3111 h60
Drill Drawing:
  drawing of 185 lines, arcs and shapes, not listed
  text "Symbol" at -38.06,7649.99 h72
  text "Count" at 467.81,7649.99 h72
  text "Hole Size" at 1057.66,7649.99 h72
  text "Plated" at 2207.32,7649.99 h72
  text "Hole Type" at 2713.2,7649.99 h72
  text "Drill Layer Pair" at 3447,7649.99 h72
  text "Via/Pad" at 4946.55,7649.99 h72
  text "Pad Shape" at 5536.4,7649.99 h72
  text "Template" at 6282.2,7649.99 h72
  text "Description" at 7471.85,7649.99 h72
  text "Hole Tolerance (+)" at 8325.61,7649.99 h72
  text "Hole Tolerance (-)" at 9659.22,7649.99 h72
  text "2" at 467.81,7499.99 h60
  text "62.99mil (1.600mm)" at 1057.66,7499.99 h60
  text "PTH" at 2207.32,7499.99 h60
  text "Round" at 2713.2,7499.99 h60
  text "Top Layer - Bottom Layer" at 3447,7499.99 h60
  text "Pad" at 4946.55,7499.99 h60
  text "Rounded" at 5536.4,7499.99 h60
  text "c280h160" at 6282.2,7499.99 h60
  text "2" at 467.81,7349.99 h60
  text "125.98mil (3.200mm)" at 1057.66,7349.99 h60
  text "NPTH" at 2207.32,7349.99 h60
  text "Round" at 2713.2,7349.99 h60
  text "Top Layer - Bottom Layer" at 3447,7349.99 h60
  text "Pad" at 4946.55,7349.99 h60
  text "Rounded" at 5536.4,7349.99 h60
  text "c0hn320p0" at 6282.2,7349.99 h60
  text "A" at -67.15,7340 h66.67
  text "3" at 467.81,7199.99 h60
  text "39.02mil (0.991mm)" at 1057.66,7199.99 h60
  text "NPTH" at 2207.32,7199.99 h60
  text "Round" at 2713.2,7199.99 h60
  text "Top Layer - Bottom Layer" at 3447,7199.99 h60
  text "Pad" at 4946.55,7199.99 h60
  text "Rounded" at 5536.4,7199.99 h60
  text "c0hn99" at 6282.2,7199.99 h60
  text "4" at 467.81,7049.99 h60
  text "28.35mil (0.720mm)" at 1057.66,7049.99 h60
  text "PTH" at 2207.32,7049.99 h60
  text "Round" at 2713.2,7049.99 h60
  text "Top Layer - Bottom Layer" at 3447,7049.99 h60
  text "Pad" at 4946.55,7049.99 h60
  text "Rounded" at 5536.4,7049.99 h60
  text "c110h72m115mx115p0" at 6282.2,7049.99 h60
  text "B" at -67.15,7040 h66.67
  text "4" at 467.81,6899.99 h60
  text "70.87mil (1.800mm)" at 1057.66,6899.99 h60
  text "PTH" at 2207.32,6899.99 h60
  text "Slot" at 2713.2,6899.99 h60
  text "Top Layer - Bottom Layer" at 3447,6899.99 h60
  text "Pad" at 4946.55,6899.99 h60
  text "(Mixed)" at 5536.4,6899.99 h60
  text "(Mixed)" at 6282.2,6899.99 h60
  text "4" at 467.81,6749.99 h60
  text "93.50mil (2.375mm)" at 1057.66,6749.99 h60
  text "NPTH" at 2207.32,6749.99 h60
  text "Round" at 2713.2,6749.99 h60
  text "Top Layer - Bottom Layer" at 3447,6749.99 h60
  text "Pad" at 4946.55,6749.99 h60
  text "Rounded" at 5536.4,6749.99 h60
  text "c0hn238" at 6282.2,6749.99 h60
  text "4" at 467.81,6599.99 h60
  text "122.05mil (3.100mm)" at 1057.66,6599.99 h60
  text "PTH" at 2207.32,6599.99 h60
  text "Round" at 2713.2,6599.99 h60
  text "Top Layer - Bottom Layer" at 3447,6599.99 h60
  text "Pad" at 4946.55,6599.99 h60
  text "Rounded" at 5536.4,6599.99 h60
  text "c0h310" at 6282.2,6599.99 h60
  text "7" at 467.81,6449.99 h60
  text "35.43mil (0.900mm)" at 1057.66,6449.99 h60
  text "PTH" at 2207.32,6449.99 h60
  text "Round" at 2713.2,6449.99 h60
  text "Top Layer - Bottom Layer" at 3447,6449.99 h60
  text "Pad" at 4946.55,6449.99 h60
  text "(Mixed)" at 5536.4,6449.99 h60
  text "(Mixed)" at 6282.2,6449.99 h60
  text "8" at 467.81,6299.99 h60
  text "39.37mil (1.000mm)" at 1057.66,6299.99 h60
  text "PTH" at 2207.32,6299.99 h60
  text "Round" at 2713.2,6299.99 h60
  text "Top Layer - Bottom Layer" at 3447,6299.99 h60
  text "Pad" at 4946.55,6299.99 h60
  text "Rounded" at 5536.4,6299.99 h60
  text "c152h100m157mx157p0" at 6282.2,6299.99 h60
  text "8" at 467.81,6149.99 h60
  text "59.06mil (1.500mm)" at 1057.66,6149.99 h60
  text "PTH" at 2207.32,6149.99 h60
  text "Round" at 2713.2,6149.99 h60
  text "Top Layer - Bottom Layer" at 3447,6149.99 h60
  text "Pad" at 4946.55,6149.99 h60
  text "(Mixed)" at 5536.4,6149.99 h60
  text "(Mixed)" at 6282.2,6149.99 h60
  text "8" at 467.81,5999.99 h60
  text "59.45mil (1.510mm)" at 1057.66,5999.99 h60
  text "PTH" at 2207.32,5999.99 h60
  text "Round" at 2713.2,5999.99 h60
  text "Top Layer - Bottom Layer" at 3447,5999.99 h60
  text "Pad" at 4946.55,5999.99 h60
  text "Rounded" at 5536.4,5999.99 h60
  text "c300h151" at 6282.2,5999.99 h60
  text "8" at 467.81,5849.99 h60
  text "66.93mil (1.700mm)" at 1057.66,5849.99 h60
  text "PTH" at 2207.32,5849.99 h60
  text "Round" at 2713.2,5849.99 h60
  text "Top Layer - Bottom Layer" at 3447,5849.99 h60
  text "Pad" at 4946.55,5849.99 h60
  text "(Mixed)" at 5536.4,5849.99 h60
  text "(Mixed)" at 6282.2,5849.99 h60
  text "9" at 467.81,5699.99 h60
  text "98.43mil (2.500mm)" at 1057.66,5699.99 h60
  text "NPTH" at 2207.32,5699.99 h60
  text "Round" at 2713.2,5699.99 h60
  text "Top Layer - Bottom Layer" at 3447,5699.99 h60
  text "Pad" at 4946.55,5699.99 h60
  text "Rounded" at 5536.4,5699.99 h60
  text "c0hn250p0" at 6282.2,5699.99 h60
  text "16" at 467.81,5549.99 h60
  text "70.87mil (1.800mm)" at 1057.66,5549.99 h60
  text "PTH" at 2207.32,5549.99 h60
  text "Round" at 2713.2,5549.99 h60
  text "Top Layer - Bottom Layer" at 3447,5549.99 h60
  text "Pad" at 4946.55,5549.99 h60
  text "(Mixed)" at 5536.4,5549.99 h60
  text "(Mixed)" at 6282.2,5549.99 h60
  text "24" at 467.81,5399.99 h60
  text "35.43mil (0.900mm)" at 1057.66,5399.99 h60
  text "PTH" at 2207.32,5399.99 h60
  text "Round" at 2713.2,5399.99 h60
  text "Top Layer - Bottom Layer" at 3447,5399.99 h60
  text "Pad" at 4946.55,5399.99 h60
  text "(Mixed)" at 5536.4,5399.99 h60
  text "(Mixed)" at 6282.2,5399.99 h60
  text "105" at 467.81,5249.99 h60
  text "11.81mil (0.300mm)" at 1057.66,5249.99 h60
  text "PTH" at 2207.32,5249.99 h60
  text "Round" at 2713.2,5249.99 h60
  text "Top Layer - Bottom Layer" at 3447,5249.99 h60
  text "Via" at 4946.55,5249.99 h60
  text "Rounded" at 5536.4,5249.99 h60
  text "v60h30m0mx0" at 6282.2,5249.99 h60
  text "216 Total" at 467.81,5099.99 h60
  text "Slot definitions :" at -38.06,4955.02 h60
  text "Routed Path Length" at 994.63,4955.02 h60
  text "= Calculated from tool start centre position to tool end centre position." at 2097.29,4955.02 h60
  text "Hole Length" at 994.63,4855.05 h60
  text "= Routed Path Length + Tool Size = Slot length as defined in the PCB layout" at 1687.43,4855.05 h60

## Dimensions
8109.87,4176.88 to 8109.87,-153.83 on Dimensions
-157.85,4176.88 to 8109.87,4176.88 on Dimensions

## Text inside footprints (layer, text, board x,y; h text height)
J1: Top Overlay "1" at 7967.8,2636.17 h31.5 r180
K1: Top Overlay "1" at 434.82,2178.73 h31.5
K2: Top Overlay "1" at 2028.53,2178.73 h31.5
K3: Top Overlay "1" at 3622.24,2178.73 h31.5
K4: Top Overlay "1" at 5215.96,2178.73 h31.5
SW2: Top Overlay "2" at 3644.37,2640.15 h19.68; Top Overlay "1" at 3544.37,2639.45 h19.68; Top Overlay "ON" at 3523.5,2836.27 h19.68